# Altium PCB PCB_The-Guvnor_2026-10-25.pcbdoc
Units mil, origin at the board's own origin, x right, y up, seen from the top; angles counter-clockwise.
Board outline 4947 x 4947 mil, 2 copper layers (Top Layer, Bottom Layer); 47 components, 26 nets, 104 pads, 7 vias.
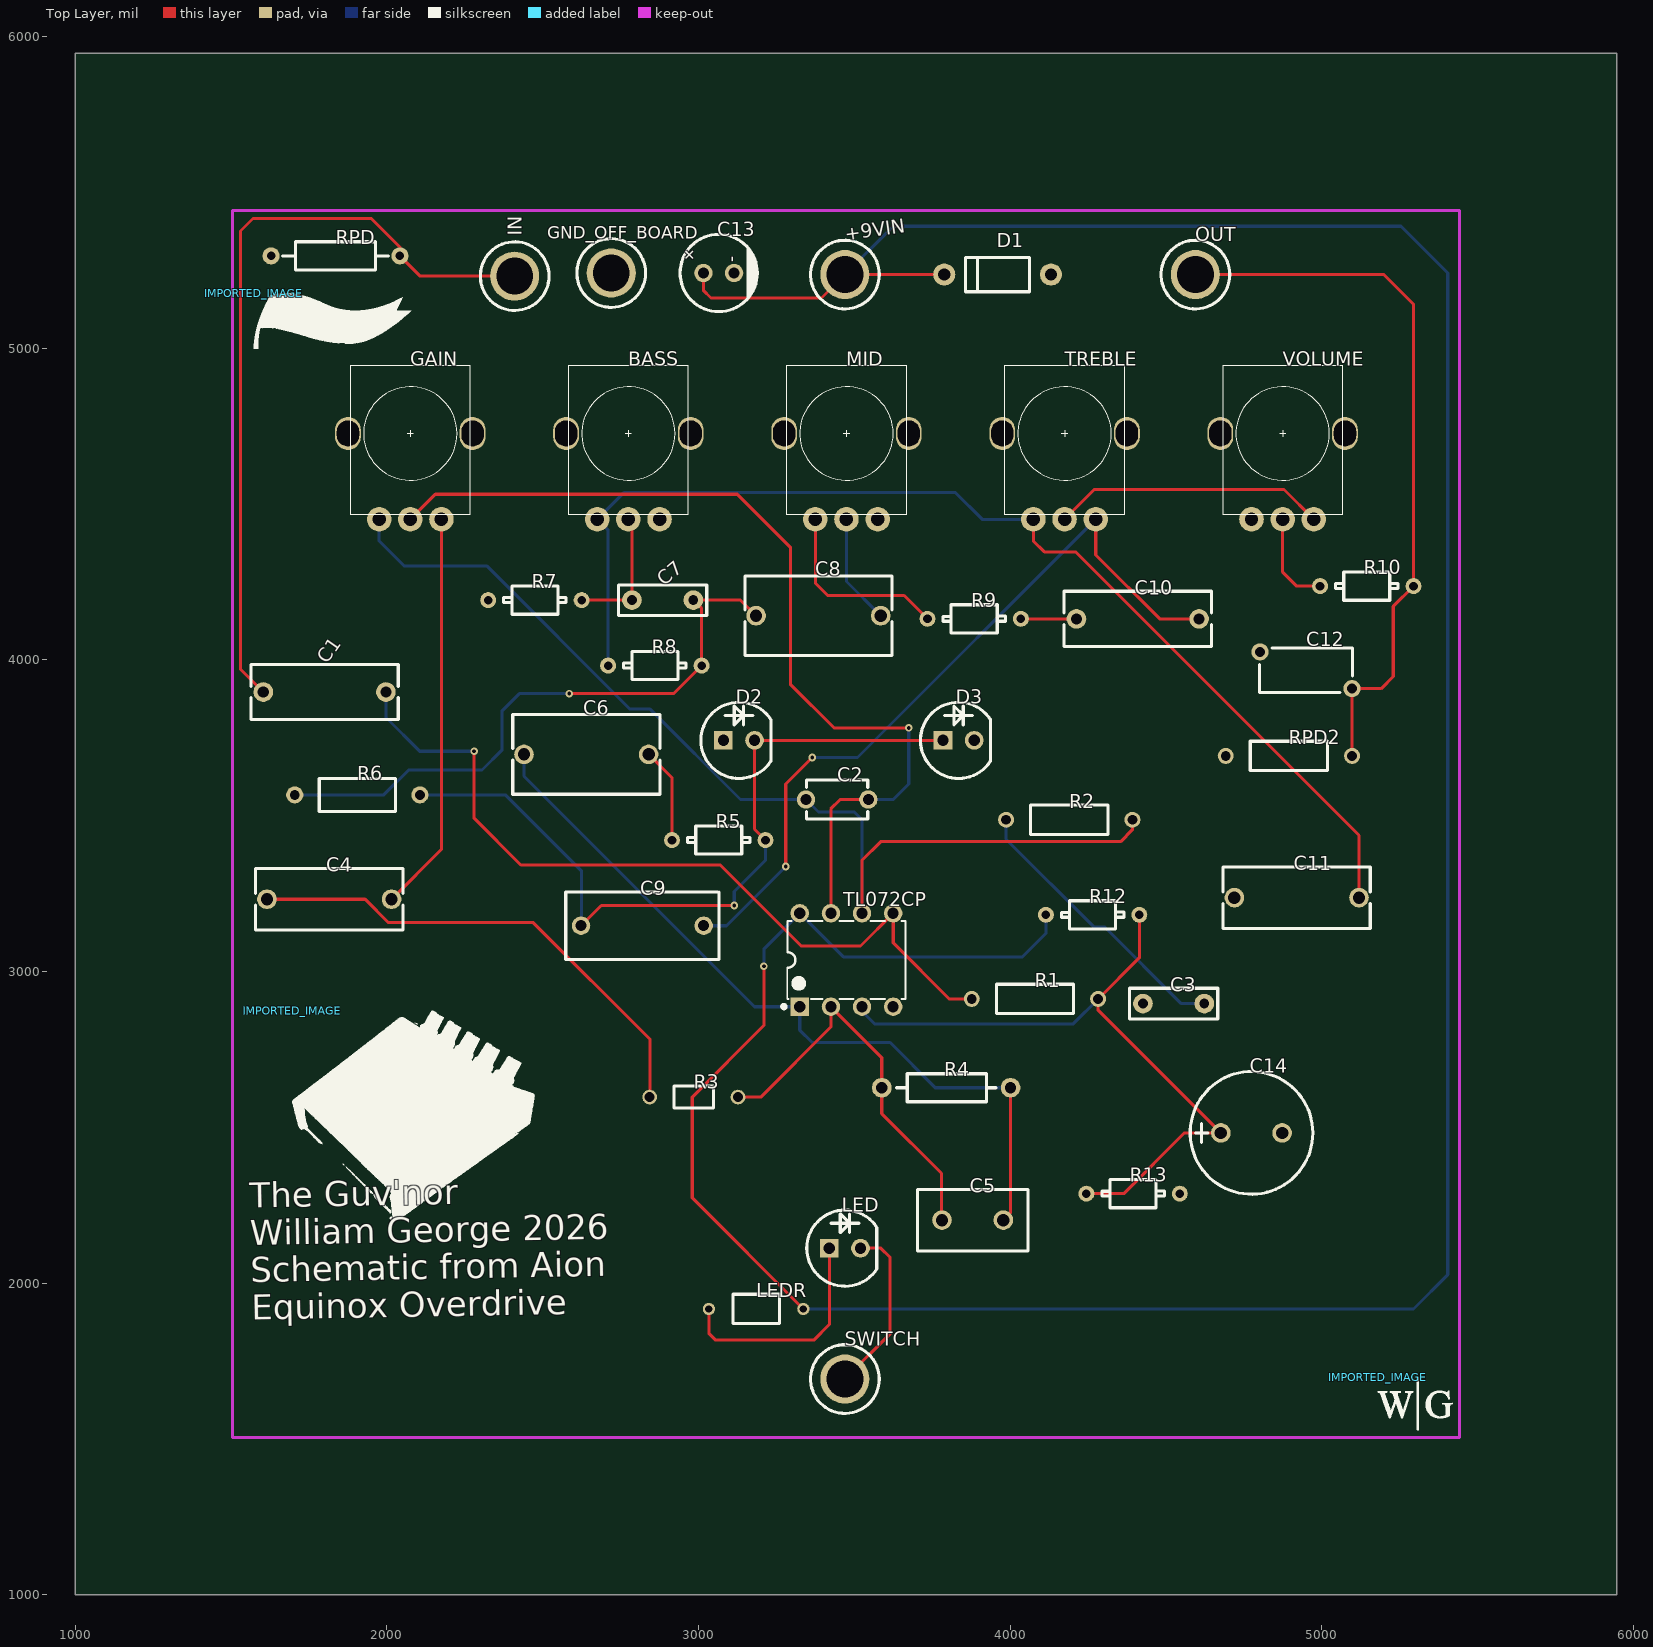
[diagram p0: Top Layer view]
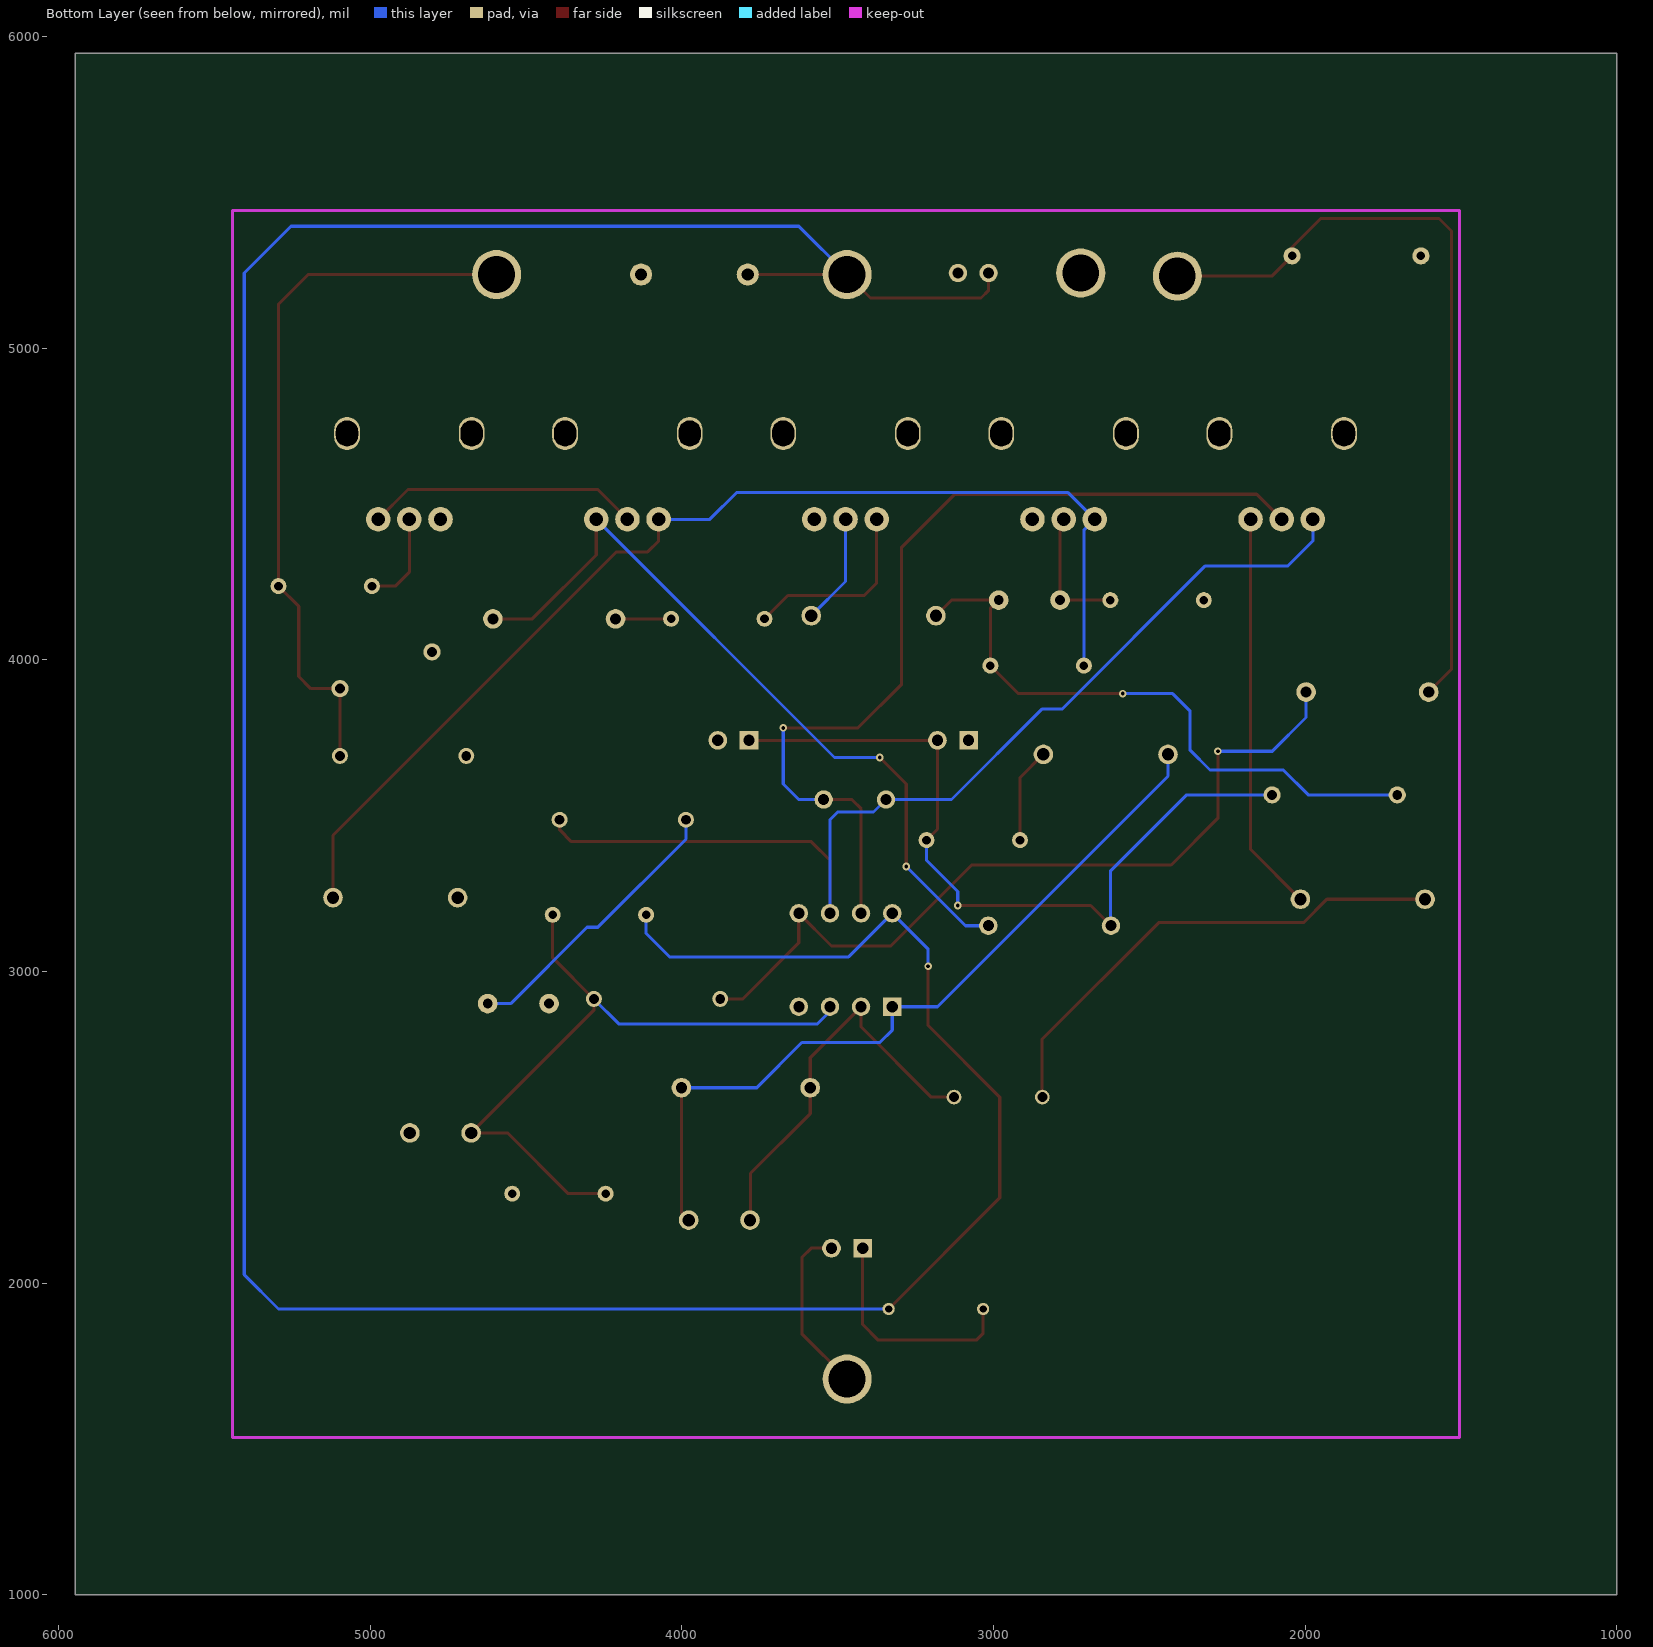
[diagram p1: Bottom Layer view, seen from below]

## Layer stack, top to bottom
Top Layer: signal copper (thickness not stored)
Dielectric: dielectric 12.6, FR-4, Dk 4.8
Bottom Layer: signal copper (thickness not stored)

## Board outline
5947,1000 1000,1000 1000,5947 5947,5947

## Components (designator, comment, footprint, x,y, rotation, side; value= is the part's Value field where it differs from the comment)
+9VIN "PAD" SPACER 3470,5237 r0 top
BASS "Alpha-RV09-9mmVertical" ALPHA9MM 2775,4727 r0 top
C1 "10nF" CAP-TH_L12.0-W4.5-P10.00-D0.6 1800,3897 r0 top
C2 "120pF" CAP-TH_L5.0-W3.2-P5.08-D0.6 3445,3552 r0 top
C3 "100nF" CAP-TH_L7.2-W2.5-P5.00-D0.5 4525,2897 r0 top
C4 "68nF" CAP-TH_L12.0-W5.0-P10.00-D1.0 1815,3232 r0 top
C5 "220pF" CAP-TH_L9.0-W5.0-P5.00-D0.6 3880,2202 r0 top
C6 "220nF" CAP-TH_L12.0-W6.5-P10.00-D1.0 2640,3697 r0 top
C7 "100nF" CAP-TH_L7.2-W2.5-P5.00-D0.5 2885,4192 r0 top
C8 "220nF" CAP-TH_L12.0-W6.5-P10.00-D1.0 3385,4142 r0 top
C9 "4.7nF" CAP-TH_L12.5-W5.5-P10.00-D0.6 2820,3147 r0 top
C10 "10nF" CAP-TH_L12.0-W4.5-P10.00-D0.6 4410,4132 r0 top
C11 "68nF" CAP-TH_L12.0-W5.0-P10.00-D1.0 4920,3237 r0 top
C12 "470pF" CAP-TH_L7.5-W3.5-P7.50-D0.8-S3.0 4950,3967 r0 top
C13 "47uF" CAP-TH_BD6.3-P2.50-D0.5-FD_5 3065,5242 r0 top
C14 "10uF" CAP-TH_BD10.0-P5.00-D0.6-FD_8 4775,2482 r0 top
D1 "1N4001_C2456" DO-41_BD2.4-L4.7-P8.70-D0.9-RD 3960,5237 r0 top
D2 "L-513ID" LED-TH_BD5.9-P2.54-FD-1 3130,3742 r0 top
D3 "L-513ID" LED-TH_BD5.9-P2.54-FD-1 3835,3742 r0 top
GAIN "Alpha-RV09-9mmVertical" ALPHA9MM 2075,4727 r0 top
GND_OFF_BOARD "PAD" SPACER 2720,5242 r0 top
IMPORTED_IMAGE "IMPORTED_IMAGE" IMPORTED_IMAGE 5180,1697 r0 top
IMPORTED_IMAGE "IMPORTED_IMAGE" IMPORTED_IMAGE 1572.14,5177.02 r0 top
IMPORTED_IMAGE "IMPORTED_IMAGE" IMPORTED_IMAGE 1696.26,2874.5 r0 top
IN "PAD" SPACER 2410,5232 r0 top
LED "L-513ID" LED-TH_BD5.9-P2.54-FD-1 3470,2112 r0 top
LEDR "4.7kΩ" RES-TH_BD2.3-L3.7-P7.70-D0.4 3185,1917 r0 top
MID "Alpha-RV09-9mmVertical" ALPHA9MM 3475,4727 r0 top
OUT "PAD" SPACER 4595,5237 r0 top
R1 "1MΩ" RES-TH_BD2.4-L6.3-P10.30-D0.6 4080,2912 r0 top
R2 "2.2kΩ" RES-TH_BD2.4-L6.3-P10.30-D0.6 4190,3487 r0 top
R3 "10kΩ" RES-TH_BD1.8-L3.2-P7.20-D0.4 2985,2597 r0 top
R4 "680kΩ" RES-TH_BD2.2-L6.5-P10.50-D0.6 3795,2627 r0 top
R5 "1kΩ" RES-TH_BD2.3-L3.7-P7.70-D0.9 3065,3422 r0 top
R6 "1.5kΩ" RES-TH_BD2.7-L6.2-P10.20-D0.4 1905,3567 r0 top
R7 "680Ω" RES-TH_BD2.3-L3.7-P7.70-D0.9 2475,4192 r0 top
R8 "680Ω" RES-TH_BD2.3-L3.7-P7.70-D0.9 2860,3982 r0 top
R9 "100Ω" RES-TH_BD2.3-L3.7-P7.70-D0.9 3885,4132 r0 top
R10 "22kΩ" RES-TH_BD2.3-L3.7-P7.70-D0.9 5145,4237 r0 top
R12 "47kΩ" RES-TH_BD2.3-L3.7-P7.70-D0.9 4265,3182 r0 top
R13 "47kΩ" RES-TH_BD2.3-L3.7-P7.70-D0.9 4395,2287 r0 top
RPD "2.2MΩ" RES-TH_BD2.3-L6.5-P10.50-D0.5 1835,5297 r0 top
RPD2 "1MΩ" RES-TH_BD2.4-L6.3-P10.30-D0.6 4895,3692 r0 top
SWITCH "PAD" SPACER 3470,1692 r0 top
TL072CP "TL072CP" DIP-8_L9.6-W6.4-P2.54-LS7.6-BL-1 3475,3037 r0 top
TREBLE "Alpha-RV09-9mm" ALPHA9MM 4175,4727 r0 top
VOLUME "Alpha-RV09-9mm" ALPHA9MM 4875,4727 r0 top

## Footprints (in the part's own frame and the unit in brackets; to place one, negate y for a bottom-side part, rotate by r counter-clockwise, add the part's x,y. Pads: shape width x height; smd on the part's side, far side on the other; paste and mask are expansions set on the pad)
ALPHA9MM [mm]
  round 2 hole 1.1 paste+0 mask+0.05: 1(2.54,-7) 2(0,-7) 3(-2.54,-7)
  oval 2.1x2.7 hole 1.8 slot 2.1 at 90 deg paste+0 mask+0.05: MNT1(-5.08,0) MNT2(5.08,0)
  silkscreen extent -4.9,-6.6 4.9,5.5
CAP-TH_BD6.3-P2.50-D0.5-FD_5 [mm]
  round 1.5 hole 0.9 paste+0 mask+0.05: 1(-1.25,0) 2(1.25,0)
  silkscreen extent -3.15,-3.15 3.21,3.15
CAP-TH_BD10.0-P5.00-D0.6-FD_8 [mm]
  round 1.6 hole 1 paste+0 mask+0.051: 1(-2.5,0) 2(2.5,0)
  silkscreen extent -5,-5 5,5
CAP-TH_L5.0-W3.2-P5.08-D0.6 [mm]
  round 1.5 hole 0.9 paste+0 mask+0.05: 1(-2.54,0) 2(2.54,0)
  silkscreen extent -2.5,-1.6 2.5,1.6
CAP-TH_L7.2-W2.5-P5.00-D0.5 [mm]
  round 1.6 hole 0.8 paste+0 mask+0.05: 1(-2.5,0) 2(2.5,0)
  silkscreen extent -3.6,-1.25 3.6,1.25
CAP-TH_L7.5-W3.5-P7.50-D0.8-S3.0 [mm]
  round 1.4 hole 0.8 paste+0 mask+0.051: 1(-3.75,1.5) 2(3.75,-1.5)
  silkscreen extent -3.8,-1.8 3.8,1.8
CAP-TH_L9.0-W5.0-P5.00-D0.6 [mm]
  round 1.6 hole 1 paste+0 mask+0.051: 1(-2.5,0) 2(2.5,0)
  silkscreen extent -4.5,-2.5 4.5,2.5
CAP-TH_L12.0-W4.5-P10.00-D0.6 [mm]
  round 1.6 hole 0.9 paste+0 mask+0.051: 1(-5,0) 2(5,0)
  silkscreen extent -6,-2.25 6,2.25
CAP-TH_L12.0-W5.0-P10.00-D1.0 [mm]
  round 1.6 hole 1 paste+0 mask+0.051: 1(-5.08,0) 2(5.08,0)
  silkscreen extent -6,-2.5 6,2.5
CAP-TH_L12.0-W6.5-P10.00-D1.0 [mm]
  round 1.6 hole 1 paste+0 mask+0.051: 1(-5.08,0) 2(5.08,0)
  silkscreen extent -6,-3.25 6,3.25
CAP-TH_L12.5-W5.5-P10.00-D0.6 [mm]
  round 1.5 hole 0.9 paste+0 mask+0.05: 1(-5,0) 2(5,0)
  silkscreen extent -6.25,-2.75 6.25,2.75
DIP-8_L9.6-W6.4-P2.54-LS7.6-BL-1 [mm]
  rect 1.5x1.5 hole 0.9 paste+0 mask+0.051: 1(-3.81,-3.81)
  round 1.5 hole 0.9 paste+0 mask+0.051: 2(-1.27,-3.81) 3(1.27,-3.81) 4(3.81,-3.81) 5(3.81,3.81) 6(1.27,3.81) 7(-1.27,3.81) 8(-3.81,3.81)
  silkscreen extent -5.25,-3.95 4.8,3.17
DO-41_BD2.4-L4.7-P8.70-D0.9-RD [mm]
  round 1.8 hole 1 paste+0 mask+0.051: 1(-4.35,0) 2(4.35,0)
  silkscreen extent -2.6,-1.4 2.6,1.4
IMPORTED_IMAGE [mil]
  silkscreen extent 0,-170 241,0
LED-TH_BD5.9-P2.54-FD-1 [mil]
  rect 60x60 hole 36 paste+0 mask+2: 1(-50,0)
  round 60 hole 36 paste+0 mask+2: 2(50,0)
  silkscreen extent -122,-122 102,122
RES-TH_BD1.8-L3.2-P7.20-D0.4 [mm]
  round 1.2 hole 0.8 paste+0 mask+0.051: 1(-3.6,0) 2(3.6,0)
  silkscreen extent -1.6,-0.9 1.6,0.9
RES-TH_BD2.2-L6.5-P10.50-D0.6 [mm]
  round 1.6 hole 0.914 paste+0 mask+0.051: 1(-5.25,0) 2(5.25,0)
  silkscreen extent -4.06,-1.14 4.06,1.14
RES-TH_BD2.3-L3.7-P7.70-D0.4 [mm]
  round 1 hole 0.6 paste+0 mask+0.05: 1(-3.85,0) 2(3.85,0)
  silkscreen extent -1.9,-1.2 1.9,1.2
RES-TH_BD2.3-L3.7-P7.70-D0.9 [mm]
  round 1.3 hole 0.7 paste+0 mask+0.051: 1(-3.81,0) 2(3.81,0)
  silkscreen extent -2.55,-1.15 2.55,1.15
RES-TH_BD2.3-L6.5-P10.50-D0.5 [mm]
  round 1.4 hole 0.7 paste+0 mask+0.051: 1(-5.25,0) 2(5.25,0)
  silkscreen extent -4.32,-1.15 4.32,1.15
RES-TH_BD2.4-L6.3-P10.30-D0.6 [mm]
  round 1.3 hole 0.8 paste+0 mask+0.051: 1(-5.15,0) 2(5.15,0)
  silkscreen extent -3.15,-1.2 3.15,1.2
RES-TH_BD2.7-L6.2-P10.20-D0.4 [mm]
  round 1.4 hole 0.8 paste+0 mask+0.051: 1(-5.1,0) 2(5.1,0)
  silkscreen extent -3.1,-1.35 3.1,1.35
SPACER [mm]
  round 4 hole 3 paste+0 mask+0.051: 1(0,0)
  silkscreen extent -2.8,-2.8 2.8,2.8

## Via types
v1: diameter 24.41, hole 12.2, Top Layer to Bottom Layer, tented both sides, 7 vias

## Nets (pads, with @x,y where several pads share a name; then routed paths per layer and width w, separated by ;. In a path a pad name is that pad's centre, name@x,y a point inside that pad or via, vN(x,y) a via of type N, cw(c..) or ccw(c..) an arc to the next point about the centre after c; other vN are vias at no path point)
8: +9VIN.1 C13.1 D1.1 LEDR.2 R12.1 TL072CP.8 | length 10759.8
  Top Layer w10: C13.1 3015.79,5186.21 3040,5162 3395,5162 +9VIN.1 D1.1 ; v1(3210,3017) 3210,2827 2980,2597 2980,2273.57 LEDR.2
  Bottom Layer w10: v1(3210,3017) 3210,3072 TL072CP.8 3465,3047 4040,3047 4115,3122 R12.1 ; LEDR.2 5295,1917 5405,2027 5405,5242 5255,5392 3625,5392 +9VIN.1
C1_1: C1.1 IN.1 RPD.2 | length 2500.1
  Top Layer w10: C1.1 1530,3970.15 1530,5377 1570,5417 1950,5417 2041.69,5325.31 RPD.2 2106.69,5232 IN.1
C2_2: C2.2 GAIN.2 TL072CP.7 | length 2999.9
  Top Layer w10: GAIN.2 2155.59,4532 3125,4532 3295,4362 3295,3922 3435,3782 v1(3675,3782) ; TL072CP.7 3425,3522 3455,3552 C2.2
  Bottom Layer w10: C2.2 3625,3552 3675,3602 v1(3675,3782)
C3_2: C3.2 R2.1 | length 917
  Bottom Layer w10: R2.1 3987.24,3424.76 4270,3142 4305,3142 4550,2897 C3.2
C4_1: C4.1 R3.1 | length 1602.1
  Top Layer w10: C4.1 1930,3232 2005,3157 2470,3157 2845,2782 2845,2598.73 R3.1
C4_2: C4.2 GAIN.1 | length 1285.7
  Top Layer w10: C4.2 2175,3392 GAIN.1
C6_2: C6.2 R5.1 | length 306.1
  Top Layer w10: C6.2 2915,3622 R5.1
C7_1: BASS.2 C7.1 R7.2 | length 425.8
  Top Layer w10: R7.2 C7.1 2786.58,4439.83 BASS.2
C8_2: C8.2 MID.2 | length 355
  Bottom Layer w10: MID.2 3475,4252 C8.2
C9_2: C9.2 C10.2 TREBLE.1 | length 2484.9
  Top Layer w10: v1(3280,3337) 3280,3602 v1(3365,3687) ; TREBLE.1 4275,4337 4480,4132 C10.2
  Bottom Layer w10: C9.2 3090,3147 v1(3280,3337) ; v1(3365,3687) 3510.59,3687 TREBLE.1
C10_1: C10.1 R9.2 | length 178.1
  Top Layer w10: R9.2 C10.1
GND: BASS.1 C3.1 C11.1 C12.1 C13.2 C14.2 D1.2 D2.1 D3.2 GND_OFF_BOARD.1 MID.1 R7.1 R13.2 RPD2.1 RPD.1 TL072CP.4 VOLUME.3
LED_2: LED.2 SWITCH.1 | length 557.5
  Top Layer w10: SWITCH.1 3615,1837 3615,2082 3585,2112 LED.2
LEDR_1: LED.1 LEDR.1 | length 739.6
  Top Layer w10: LEDR.1 3033.43,1838.58 3055,1817 3370,1817 3420,1867 LED.1
R2_2: C2.1 GAIN.3 R2.2 TL072CP.6 | length 3400.6
  Top Layer w10: TL072CP.6 3525,3357 3585,3417 4355,3417 4392.76,3454.76 R2.2
  Bottom Layer w10: GAIN.3 1975,4382 2055,4302 2320,4302 2780,3842 2845,3842 3135,3552 C2.1 3385,3512 3500,3512 3525,3487 TL072CP.6
R3_2: C5.1 R3.2 R4.1 TL072CP.2 | length 1289.2
  Top Layer w10: R3.2 3200,2597 3425,2822 TL072CP.2 3588.3,2723.7 R4.1 3588.3,2543.7 3780,2352 3780,2203.58 C5.1
R5_2: C9.1 D2.2 D3.1 R5.2 R6.2 | length 2506.2
  Top Layer w10: C9.1@2623.15,3147 2688.15,3212 v1(3115,3212) ; R5.2 3180,3457 D2.2 D3.1
  Bottom Layer w10: R6.2 2380,3567 2625,3322 2625,3148.85 C9.1 ; v1(3115,3212) 3115,3257 3215,3357 R5.2
R6_1: C7.2 C8.1 R6.1 R8.2 | length 1994.2
  Top Layer w10: v1(2585,3892) 2920,3892 R8.2 3010,4165.43 C7.2 3135,4192 C8.1
  Bottom Layer w10: R6.1 1990,3567 2070,3647 2305,3647 2370,3712 2370,3837 2425,3892 v1(2585,3892)
R8_1: BASS.3 C11.2 R8.1 TREBLE.3 | length 3660.7
  Top Layer w10: TREBLE.3 4075,4382 4110,4347 4210,4347 5120,3437 C11.2
  Bottom Layer w10: R8.1 2710,4416.41 BASS.3 2760.59,4537 3825,4537 3910.59,4451.41 TREBLE.3
R9_1: MID.3 R9.1 | length 612
  Top Layer w10: MID.3 3375,4247 3415,4207 3660,4207 R9.1
R10_1: R10.1 VOLUME.2 | length 308
  Top Layer w10: VOLUME.2 4875,4282 4920,4237 R10.1
R10_2: C12.2 OUT.1 R10.2 RPD2.2 | length 2325.8
  Top Layer w10: OUT.1 5200,5237 5295,5142 R10.2 5230,4172 5230,3947 5190.94,3907.94 C12.2 5097.76,3907.82 RPD2.2
TL072CP_1: C5.2 C6.1 R4.2 TL072CP.1 | length 2524.5
  Top Layer w10: C5.2 4001.7,2225.26 R4.2
  Bottom Layer w10: C6.1 2440,3627 3180,2887 TL072CP.1 3325,2812 3365,2772 3615,2772 3760,2627 R4.2
TL072CP_5: C1.2 R1.1 TL072CP.5 | length 2604.9
  Top Layer w10: v1(2280,3707) 2280,3492 2430,3342 3070,3342 3330,3082 3520,3082 TL072CP.5 3625,3092 3805,2912 R1.1
  Bottom Layer w10: C1.2 1996.85,3815.15 2105,3707 v1(2280,3707)
VA: C14.1 R1.2 R12.2 R13.1 TL072CP.3 | length 2252.7
  Top Layer w10: R13.1 4365,2287 4560,2482 C14.1 4282.76,2875.82 R1.2 4415,3044.24 R12.2
  Bottom Layer w10: TL072CP.3 3525,2872 3565,2832 4202.76,2832 R1.2
VOLUME_1: TREBLE.2 VOLUME.1 | length 879.4
  Top Layer w10: TREBLE.2 4270,4547 4879.4,4547 VOLUME.1
pads on no net: BASS.MNT1 BASS.MNT2 GAIN.MNT1 GAIN.MNT2 MID.MNT1 MID.MNT2 TREBLE.MNT1 TREBLE.MNT2 VOLUME.MNT1 VOLUME.MNT2

## Polygon pours and split planes (outlines as drawn)
GND on Bottom Layer (solid): 1505,5442 5440,5442 5440,1507 1505,1507

## Silkscreen, mask and mechanical layers (free items; w line width, h text height)
Top Overlay:
  text "The Guv'nor / William George 2026 / Schematic from Aion  / Equinox Overdrive" at 1565.7,1882.01 h80 r1

## Text inside footprints (layer, text, board x,y; h text height)
C13: Top Overlay "+" at 2998.92,5295.92 h39.37 r135; Top Overlay "-" at 3124.69,5277 h39.37 r90